# Altium PCB RemoteSensorUnit-v1.0.PcbDoc (part 5 of 5)
Units mm, origin at the board's own origin, x right, y up, seen from the top; angles counter-clockwise.
Board outline 80 x 114 mm, 2 copper layers (Top Layer, Bottom Layer), stack 1.448 mm thick; 163 components, 122 nets, 631 pads, 300 vias.
Unrouted connection lines stored in the file: 147.
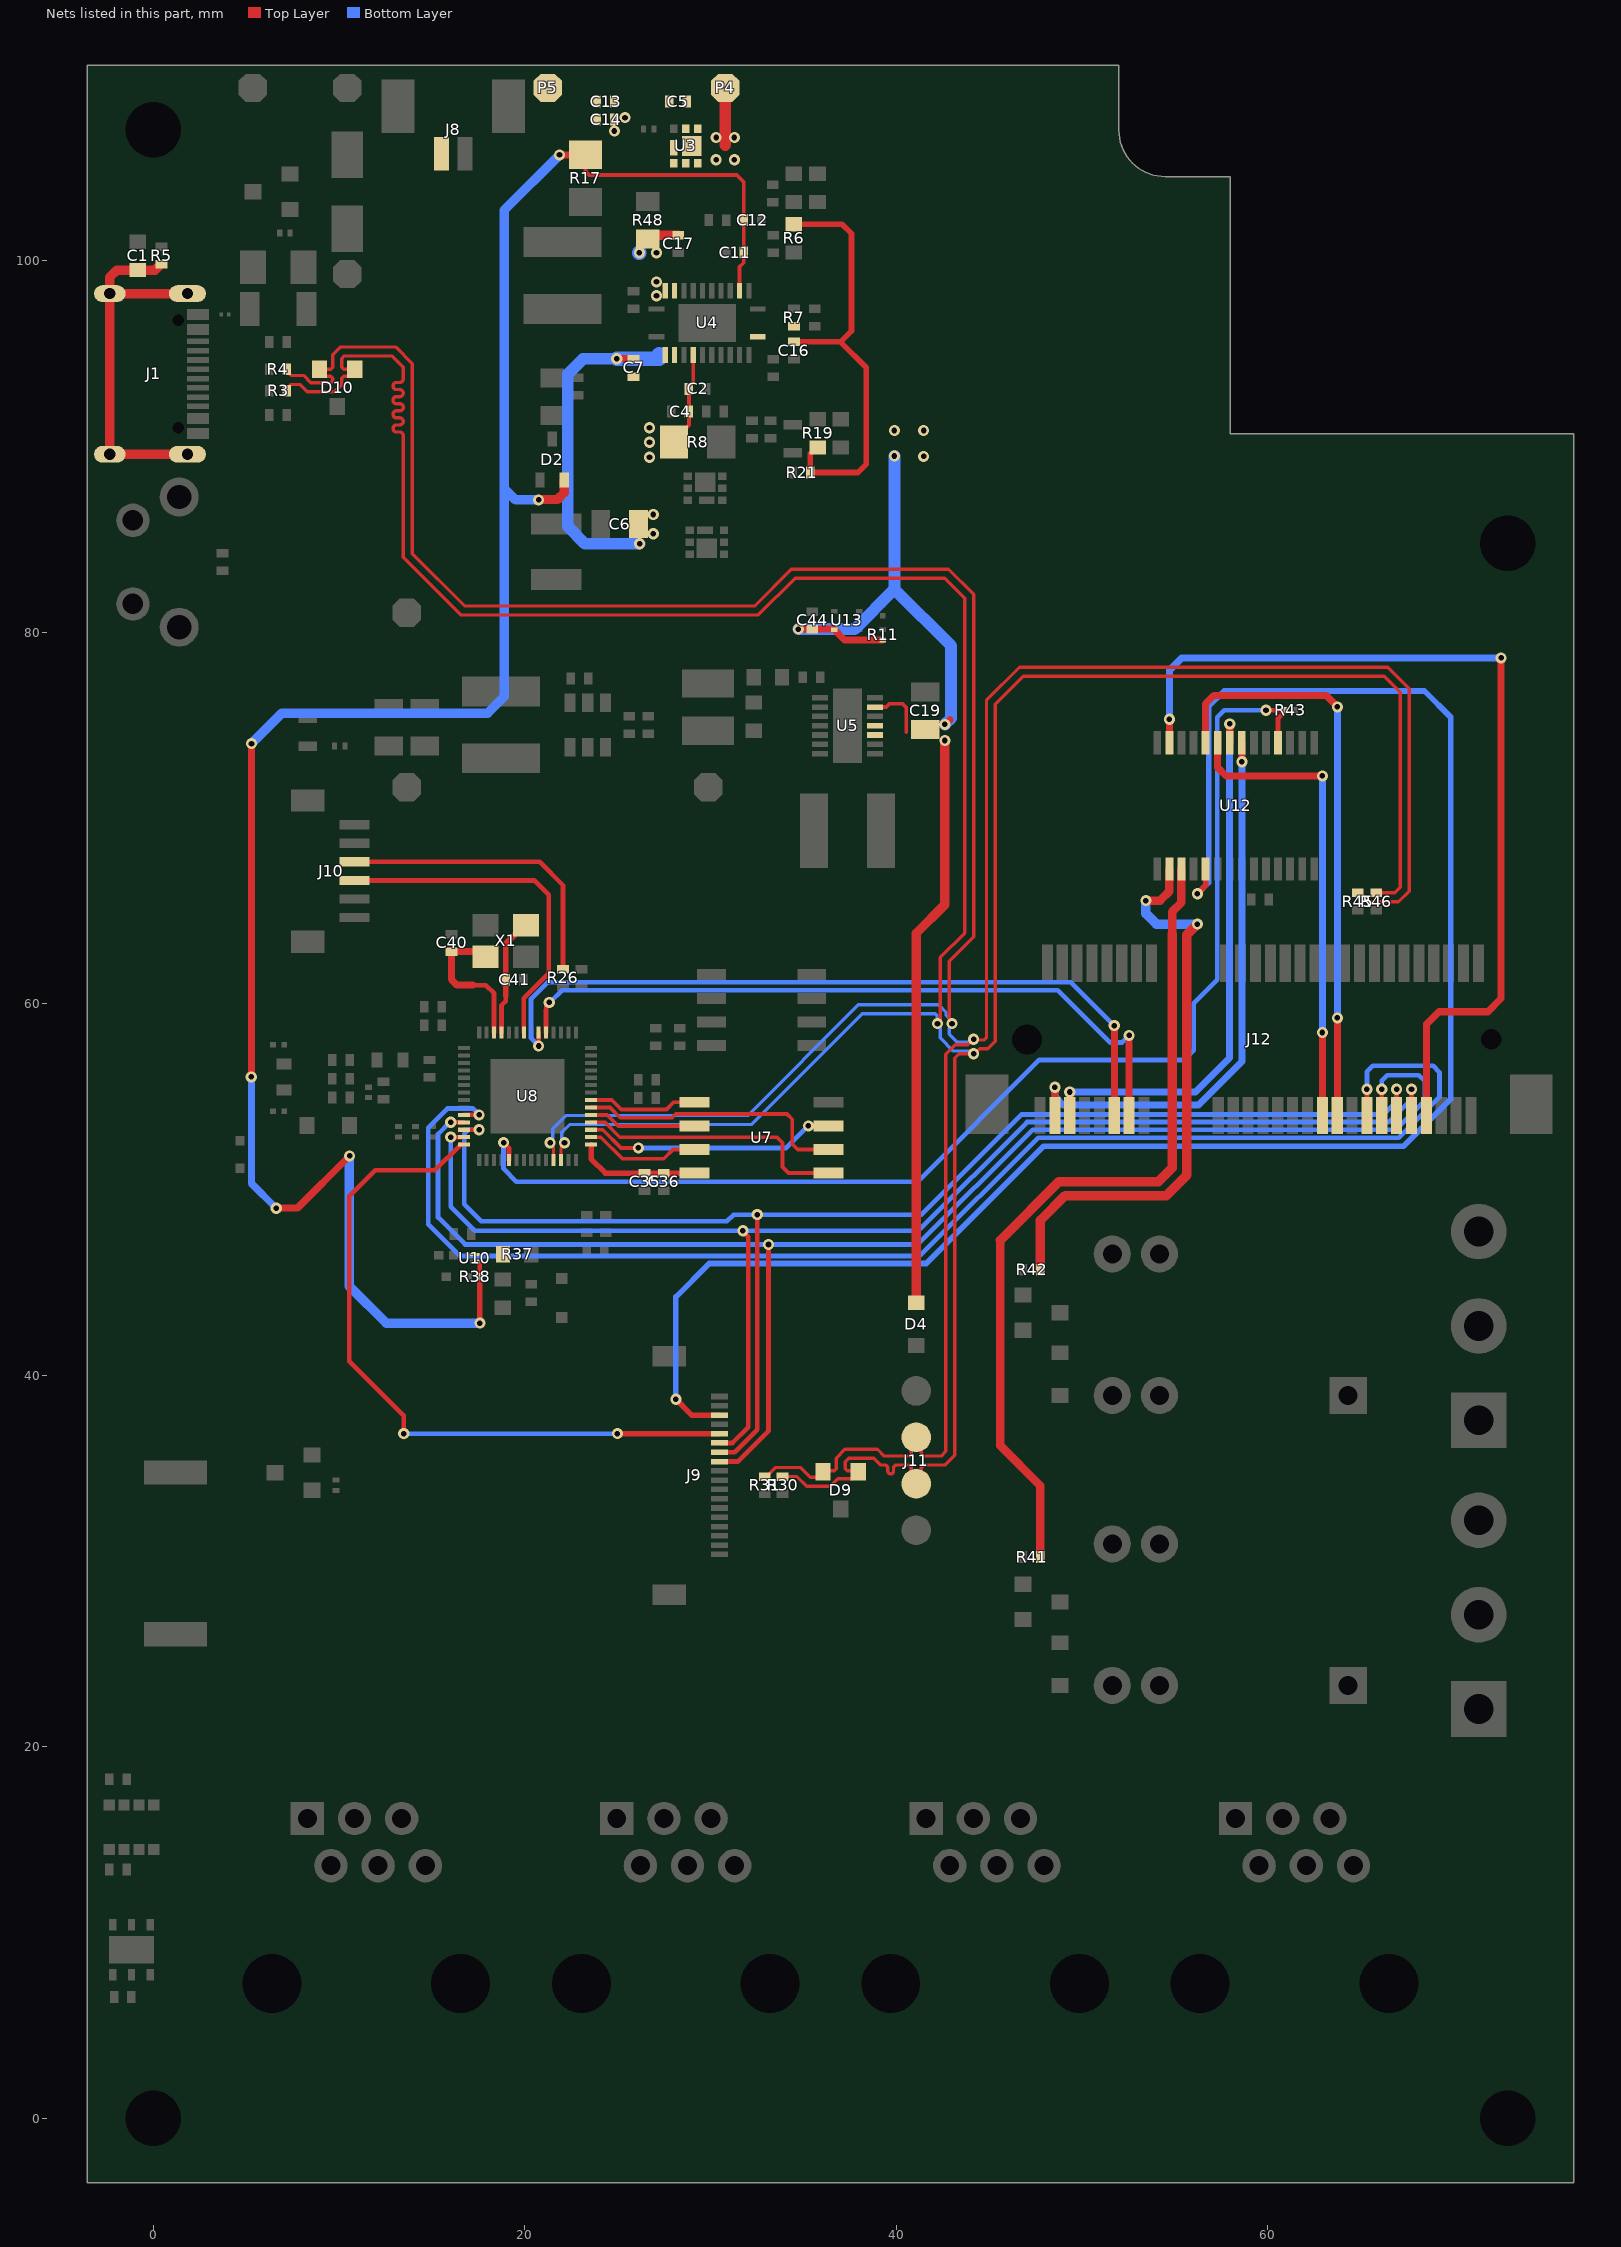
[diagram p3: the nets of this part, all layers, seen from the top]

## Via types
v1: diameter 0.6, hole 0.3, Top Layer to Bottom Layer, 300 vias

## Nets (pads, with @x,y where several pads share a name; then routed paths per layer and width w, separated by ;. In a path a pad name is that pad's centre, name@x,y a point inside that pad or via, vN(x,y) a via of type N, cw(c..) or ccw(c..) an arc to the next point about the centre after c; other vN are vias at no path point) (continued)
PGND: C5.2 C6.1 C7.1 C13.2 C14.2 C17.1 R48.2 U4.22 U4.23 | length 20.7
  Top Layer w0.381: v1(24.952,94.723) 25.834,94.723 cw(c25.834,94.7) C7.1@25.858,94.7
  Top Layer w0.508: R48.2@26.626,101.158 26.846,101.379 26.851,101.374 C17.1@28.27,101.374
  Bottom Layer w0.635: v1(24.952,94.723) 23.143,94.723 22.313,93.894 22.313,85.69 23.241,84.763 v1(26.187,84.763)
  Bottom Layer w0.762: v1(24.952,94.723) 27.242,94.723 ; v1@26.147,100.424 v1(26.175,100.424) ; 27.076,94.796 27.242,94.961
  other v1: 26.924,85.296 26.924,86.338 27.095,98.114 27.095,98.86 27.095,100.424 24.829,106.982 25.401,107.704
RELAY1: R41.1 U12.3 | length 45.1
  Top Layer w0.457: 45.606,47.26 45.606,36.199 47.763,34.041 R41.1@47.763,30.212 ; 54.855,63.754 54.855,64.95 55.357,65.452 U12.3@55.357,67.247
  Top Layer w0.508: 45.61,47.264 48.766,50.42 54.122,50.42 54.855,51.153 54.855,63.754
RELAY2: R42.1 U12.2 | length 31.7
  Top Layer w0.457: v1(53.441,65.552) 54.208,65.552 54.707,66.052 U12.2@54.707,67.247
  Top Layer w0.508: R42.1@47.763,45.682 47.763,48.338 49.091,49.666 54.547,49.666 55.652,50.77 55.652,63.717 v1(56.217,64.282)
  Bottom Layer w0.508: v1(53.441,65.552) 53.441,64.848 54.007,64.282 v1(56.217,64.282)
RST_M: R43.1 U8.19 U12.18 | length 67
  Top Layer w0.254: v1(18.862,52.525) 19.152,52.235 U8.19@19.152,51.59 ; v1(59.907,75.797) 60.924,75.797 60.932,75.789 60.932,75.747 60.557,75.372 U12.18@60.557,74.047
  Bottom Layer w0.254: v1(18.862,52.525) 18.862,51.118 19.558,50.422 41.148,50.422 47.697,56.971 55.501,56.971 56.014,57.485 56.014,60.029 57.285,61.3 57.285,75.419 57.664,75.797 v1(59.907,75.797)
RXD: J10.3 U8.50 | length 18.7
  Top Layer w0.254: J10.3@10.843,66.636 20.517,66.636 21.296,65.857 21.296,61.644 19.952,60.3 U8.50@19.952,58.44
Shell_: C1.2 J1.S1 J1.S2 J1.S3 J1.S4 R5.1 | length 21
  Top Layer w0.508: R5.1@0.441,99.8 0.403,99.8 0.098,99.495 C1.2@-0.838,99.495 -1.956,99.495 -2.337,99.114 J1.S3@-2.337,98.228 ; J1.S1@1.843,89.578 J1.S2@-2.337,89.578 J1.S3@-2.337,98.228 ; J1.S4@1.843,98.228 J1.S3@-2.337,98.228
SLOT_CS: J12.37 U8.10 | length 75.9
  Top Layer w0.254: U8.10@16.727,54.015 v1(17.549,54.015) ; J12.37@65.341,53.978 v1(65.341,55.392)
  Bottom Layer w0.254: v1(17.549,54.015) 17.202,54.362 15.847,54.362 14.811,53.325 14.811,48.119 16.511,46.418 41.27,46.418 47.641,52.789 67.061,52.789 69.247,54.975 69.247,56.311 68.901,56.657 65.663,56.657 65.341,56.336 v1(65.341,55.392)
SLOT_MISO: J9.7 J12.41 U8.12 | length 74.9
  Top Layer w0.254: U8.12@16.727,53.215 v1(17.549,53.215) ; J9.7@30.488,35.852 31.314,35.852 32.521,37.06 v1(32.521,48.644) ; J12.41@66.941,53.978 v1(66.941,55.392)
  Bottom Layer w0.254: v1(17.549,53.215) 16.96,53.215 16.739,52.993 16.739,49.2 17.65,48.289 30.887,48.289 31.242,48.644 v1(32.521,48.644) 41.359,48.644 46.744,54.029 66.224,54.029 66.941,54.746 v1(66.941,55.392)
SLOT_MOSI: J9.6 J12.43 U8.13 | length 74.2
  Top Layer w0.254: v1(16.022,52.815) U8.13@16.727,52.815 ; J9.6@30.488,36.352 31.187,36.352 32.042,37.207 32.042,47.458 31.75,47.75 v1(31.75,47.78) ; J12.43@67.741,53.978 v1(67.741,55.392)
  Bottom Layer w0.254: v1(16.022,52.815) 16.022,49.07 17.312,47.78 v1(31.75,47.78) 41.196,47.78 47.042,53.626 66.521,53.626 67.741,54.847 v1(67.741,55.392)
SLOT_SCLK: J9.8 J12.39 U8.11 | length 82.1
  Top Layer w0.254: v1@15.928,53.615 v1(16.022,53.615) U8.11@16.727,53.615 ; J9.8@30.488,35.352 31.472,35.352 33.126,37.006 v1(33.126,47.038) v1@33.192,47.105 ; J12.39@66.141,53.978 v1(66.141,55.392)
  Bottom Layer w0.254: v1(16.022,53.615) 15.967,53.615 15.337,52.985 15.337,48.492 16.791,47.038 v1(33.126,47.038) 41.172,47.038 47.347,53.213 66.883,53.213 68.472,54.801 68.472,55.82 68.137,56.154 66.433,56.154 66.141,55.862 v1(66.141,55.392)
SLOT_TYPE0: J12.3 U12.21 | length 30.4
  Top Layer w0.381: J12.3@48.541,53.978 v1(48.541,55.502) ; v1(58.607,73.028) U12.21@58.607,74.047
  Bottom Layer w0.381: v1(48.541,55.502) 48.541,54.998 48.984,54.555 56.274,54.555 58.607,56.888 v1(58.607,73.028)
SLOT_TYPE1: J12.5 U12.22 | length 29.6
  Top Layer w0.381: J12.5@49.341,53.978 v1(49.341,55.248) ; U12.22@57.957,74.047 v1(57.957,75.06)
  Bottom Layer w0.381: v1(49.341,55.248) 56.112,55.248 57.939,57.075 57.939,75.042 v1(57.957,75.06)
SLOT_TYPE2: J12.31 U12.23 | length 25.4
  Top Layer w0.381: U12.23@57.307,74.047 57.307,72.706 57.747,72.266 v1(62.941,72.266) ; J12.31@62.941,53.978 v1(62.941,58.45)
  Bottom Layer w0.381: v1(62.941,58.45) v1(62.941,72.266)
SLOT_TYPE3: J12.33 U12.24 | length 31.6
  Top Layer w0.381: U12.24@56.657,74.047 56.657,76.144 57.097,76.584 63.152,76.584 v1(63.754,75.982) ; J12.33@63.741,53.978 63.748,53.985 63.748,59.229 v1(63.754,59.236)
  Bottom Layer w0.381: v1(63.754,59.236) v1(63.754,75.982)
SLOT_UART_RX: J12.11 U8.48 | length 41
  Top Layer w0.254: v1(20.752,57.725) U8.48@20.752,58.44
  Top Layer w0.381: J12.11@51.741,53.978 v1(51.741,58.824)
  Bottom Layer w0.254: v1(20.752,57.725) 20.343,58.134 20.343,60.271 21.231,61.16 49.406,61.16 v1(51.741,58.824)
SLOT_UART_TX: J12.13 U8.47 | length 38.8
  Top Layer w0.254: U8.47@21.152,58.44 21.15,58.887 21.15,59.665 cw(c21.727,59.665) v1(21.319,60.073)
  Top Layer w0.381: J12.13@52.541,53.978 v1(52.541,58.296)
  Bottom Layer w0.254: v1(21.319,60.073) 21.363,60.073 22.02,60.731 48.699,60.731 51.521,57.909 52.154,57.909 v1(52.541,58.296)
SPICLK: U7.6 U8.33 | length 5.8
  Top Layer w0.203: U8.33@23.577,54.015 24.446,54.015 25.041,53.42 U7.6@29.15,53.42
SPICS0: U7.1 U8.32 | length 14.7
  Top Layer w0.203: U8.32@23.577,53.615 24.317,53.615 25.117,52.815 33.581,52.815 33.88,52.516 33.88,51.206 34.206,50.88 U7.1@36.36,50.88
SPID: U7.5 U8.35 | length 5.9
  Top Layer w0.203: U8.35@23.577,54.815 24.691,54.815 25.201,54.305 27.631,54.305 28.016,54.69 U7.5@29.15,54.69
SPIHD: U7.7 U8.30 | length 6.3
  Top Layer w0.203: U8.30@23.577,52.815 24.098,52.815 25.259,51.653 27.49,51.653 27.986,52.15 U7.7@29.15,52.15
SPIQ: U7.2 U8.34 | length 14.7
  Top Layer w0.203: U8.34@23.577,54.415 24.586,54.415 25.145,53.856 27.931,53.856 28.132,54.058 34.126,54.058 34.405,53.779 34.405,52.44 34.695,52.15 U7.2@36.36,52.15
SPIWP: U7.3 U8.31 | length 13.7
  Top Layer w0.203: U8.31@23.577,53.215 24.201,53.215 25.18,52.235 v1(26.121,52.235)
  Top Layer w0.254: v1(35.27,53.42) U7.3@36.36,53.42
  Bottom Layer w0.254: v1(26.121,52.235) 34.086,52.235 v1(35.27,53.42)
TFT_CS: J9.5 U8.14 | length 38.5
  Top Layer w0.254: v1@13.487,36.678 13.487,37.83 10.559,40.758 10.559,49.644 11.952,51.037 15.168,51.037 16.546,52.415 U8.14@16.727,52.415
  Top Layer w0.305: v1(24.994,36.852) J9.5@30.488,36.852
  Bottom Layer w0.254: v1(13.487,36.852) 24.965,36.852 v1@24.994,36.881
TFT_RESET: J9.3 U12.5 | length 100.7
  Top Layer w0.305: v1(28.137,38.702) 28.987,37.852 J9.3@30.488,37.852 ; v1(56.217,65.916) 56.657,66.356 U12.5@56.657,67.247
  Bottom Layer w0.305: v1(28.137,38.702) 28.137,44.215 29.934,46.012 41.621,46.012 47.933,52.324 67.311,52.324 69.85,54.863 69.85,75.42 68.432,76.838 57.658,76.838 56.82,76 56.82,66.519 v1(56.217,65.916)
TXD: J10.4 R26.2 | length 16.3
  Top Layer w0.254: J10.4@10.843,67.636 20.799,67.636 22.062,66.373 R26.2@22.062,61.865
USB.USB_N: D9.2 D10.2 J11.2 R4.2 R31.2 R45.2 U8.25 | length 198.9
  Top Layer w0.178: R4.2@7.188,94.153 7.328,94.014 7.328,93.924 7.432,93.82 8.095,93.82 8.488,93.427 9.561,93.427 9.665,93.531 9.665,93.678 9.561,93.782 9.277,93.782 8.956,94.103 D10.2@8.956,94.153 9.561,94.153 9.665,94.257 9.665,94.93 10.09,95.355 13.047,95.355 13.945,94.457 13.945,84.229 16.764,81.41 32.377,81.41 34.356,83.389 42.816,83.389 44.171,82.034 44.171,63.605 42.855,62.289 v1@42.855,58.931 ; v1(21.367,52.513) 21.367,52.399 21.552,52.214 U8.25@21.552,51.59 ; R31.2@32.923,34.546 33.012,34.546 33.494,35.028 34.86,35.028 35.385,34.502 35.762,34.502 D9.2@36.062,34.802 ; D9.2@36.112,34.852 36.667,34.852 36.771,34.957 36.771,35.541 37.242,36.012 38.993,36.012 39.358,35.647 40.7,35.647 40.804,35.751 40.804,36.006 41.076,36.279 41.076,36.425 J11.2@41.348,36.153 ; J11.2@41.076,36.656 41.348,36.384 J11.2@41.348,36.153 ; R45.2@64.842,65.967 64.991,65.967 65.473,65.485 67.041,65.485 67.615,66.058 67.615,76.962 66.469,78.108 46.638,78.108 44.856,76.327 44.856,58.169 44.737,58.05 44.204,58.05 v1(44.171,58.083) 44.147,58.083 43.852,57.788 43.183,57.788 42.672,57.277 42.672,35.901 42.418,35.647 41.489,35.647 41.348,35.788 J11.2@41.348,36.153
  Bottom Layer w0.178: v1(21.367,52.513) 21.367,52.628 21.514,52.775 21.514,53.28 22.213,53.978 32.002,53.978 37.961,59.938 42.294,59.938 42.681,59.551 42.681,59.366 43.002,59.045 v1(43.002,58.931) 43.002,58.817 42.855,58.669 42.855,58.364 43.283,57.936 43.909,57.936 44.056,58.083 v1(44.171,58.083)
USB.USB_P: D9.1 D10.1 J11.3 R3.2 R30.2 R46.2 U8.26 | length 198.4
  Top Layer w0.178: R3.2@7.194,93.003 7.334,93.143 7.334,93.233 7.438,93.337 7.895,93.337 8.288,92.944 9.76,92.944 10.147,93.331 10.147,93.678 10.251,93.782 10.535,93.782 10.856,94.103 D10.1@10.856,94.153 10.251,94.153 10.147,94.257 10.147,94.73 10.29,94.872 12.847,94.872 13.462,94.257 13.462,94.103 13.462,93.633 cw(c13.272,93.633) 13.272,93.443 13.101,93.443 ccw(c13.101,93.252) 13.101,93.062 13.272,93.062 cw(c13.272,92.871) 13.272,92.681 13.101,92.681 ccw(c13.101,92.49) 13.101,92.3 13.272,92.3 cw(c13.272,92.109) 13.272,91.919 13.101,91.919 ccw(c13.101,91.728) 13.101,91.538 13.272,91.538 cw(c13.272,91.347) 13.272,91.157 13.101,91.157 ccw(c13.101,90.966) 13.101,90.776 13.272,90.776 cw(c13.272,90.585) 13.462,90.585 13.462,89.572 13.462,84.03 16.564,80.927 32.577,80.927 34.556,82.907 42.616,82.907 43.688,81.834 43.688,63.804 42.372,62.489 v1@42.372,58.931 ; U8.26@21.952,51.59 21.952,52.206 22.144,52.399 v1(22.144,52.513) ; R30.2@33.884,34.546 34.66,34.546 35.185,34.02 36.455,34.02 36.866,34.431 37.641,34.431 37.962,34.752 D9.1@37.962,34.802 37.912,34.852 37.357,34.852 37.253,34.957 37.253,35.341 37.442,35.529 38.367,35.529 38.793,35.529 39.158,35.164 39.37,35.164 cw(c39.37,34.987) 39.548,34.987 39.548,34.841 ccw(c39.701,34.841) 39.853,34.841 39.853,34.987 cw(c40.031,34.987) 40.031,35.164 40.558,35.164 40.683,35.164 40.804,35.043 40.804,34.614 41.076,34.342 J11.3@41.348,34.614 ; J11.3@41.076,34.156 41.348,34.428 J11.3@41.348,34.614 ; R46.2@65.842,65.967 66.841,65.967 67.132,66.258 67.132,76.762 66.269,77.625 46.838,77.625 45.339,76.127 45.339,57.969 44.937,57.567 44.486,57.567 44.224,57.305 v1(44.171,57.305) 43.383,57.305 43.155,57.077 43.155,35.701 42.618,35.164 41.489,35.164 41.348,35.023 J11.3@41.348,34.614
  Bottom Layer w0.178: v1(22.144,52.513) 22.144,52.627 21.997,52.775 21.997,53.08 22.413,53.495 32.202,53.495 38.161,59.455 42.094,59.455 42.198,59.351 42.198,58.957 v1(42.224,58.931) 42.224,58.817 42.372,58.669 42.372,58.164 43.083,57.453 43.909,57.453 44.056,57.305 v1(44.171,57.305)
V_MON: R37.1 U10.3
VBAT: C11.1 C12.1 C13.1 C14.1 D2.2 J8.2 P5.1 R17.2 R38.1 U3.4 U3.8 U4.15 U10.2 | length 115.2
  Top Layer w0.203: R17.2@23.273,105.697 23.273,104.806 23.469,104.611 31.421,104.611 31.788,104.244 C12.1@31.788,102.187 C11.1@31.788,100.435 31.788,99.886 31.57,99.668 U4.15@31.57,98.378
  Top Layer w0.254: U10.2@17.506,46.104 17.585,46.026 R38.1@17.585,45.31
  Top Layer w0.305: v1(17.585,42.806) R38.1@17.585,45.277
  Top Layer w0.381: v1(5.283,56.058) v1@5.283,73.993 ; v1(6.622,48.992) 7.758,48.992 v1@10.57,51.804 ; v1(21.874,105.697) R17.2@23.273,105.697
  Top Layer w0.508: v1@10.57,51.804 v1(10.573,51.804) ; v1(20.752,87.125) 20.769,87.143 21.76,87.143 22.126,87.509 D2.2@22.126,88.194
  Bottom Layer w0.381: v1(5.283,56.058) 5.283,50.331 v1@6.605,49.009
  Bottom Layer w0.508: v1(5.294,74.004) 6.934,75.644 18.009,75.644 18.902,76.538 18.902,87.736 ; v1@6.605,49.009 v1(6.622,48.992) ; v1(10.573,51.804) 10.566,51.797 10.566,44.783 12.544,42.806 v1(17.585,42.806) ; v1(20.752,87.125) 19.513,87.125 18.902,87.736 ; v1(21.874,105.697) 18.902,102.725 18.902,87.736
VBUS: C2.1 C4.1 C5.1 C7.2 C19.2 C44.1 D4.1 P4.1 R8.2 R11.2 U3.1 U3.2 U3.5 U3.6 U3.7 U4.2 U4.3 U4.5 U5.10 U5.11 U5.13 U13.5 | length 69.4
  Top Layer w0.203: R8.2@28.042,90.229 28.042,90.356 28.842,91.156 C4.1@28.842,91.88 C2.1@28.842,93.094 28.842,93.183 29.07,93.411 U4.5@29.07,94.928 ; U5.13@38.854,75.967 39.464,75.967 39.642,76.145 40.342,76.145 40.545,75.942 40.545,74.617
  Top Layer w0.381: v1(34.735,80.167) C44.1@35.479,80.167 36.636,80.167 U13.5@36.666,80.136 37.216,79.586 R11.2@39.279,79.586 ; v1(42.621,75.035) 42.653,75.035 42.895,75.276 42.895,75.308
  Top Layer w0.508: D4.1@41.076,43.902 41.076,63.793 42.621,65.338 v1(42.621,74.171)
  Top Layer w0.635: 30.798,106.226 P4.1@30.798,109.3
  Bottom Layer w0.635: v1(34.735,80.167) 37.76,80.167 39.904,82.311 ; v1(39.904,89.487) 39.904,82.311 ; v1(42.621,75.035) 42.951,75.365 42.951,79.264 39.904,82.311
  other v1: 26.721,89.417 41.478,89.462 26.721,90.229 39.904,90.859 41.478,90.859 26.721,91.003 30.302,105.43 31.293,105.43 30.302,106.632 31.293,106.632
VDD_SPI: C35.2 C36.2 U7.8 U8.29 | length 6.7
  Top Layer w0.305: U8.29@23.577,52.415 23.577,51.648 24.345,50.88 C35.2@26.45,50.88 C36.2@27.491,50.88 U7.8@29.15,50.88
VREF: C16.2 R6.2 R7.2 R19.2 R21.1 U4.12 | length 23.8
  Top Layer w0.305: C16.2@34.496,95.628 37.007,95.628 ; R6.2@34.496,101.963 37.083,101.963 37.592,101.454 37.592,96.214 37.007,95.628 ; R19.2@35.775,89.94 35.712,89.94 35.373,89.601 R21.1@35.373,88.596 37.936,88.596 38.395,89.055 38.395,94.24 37.007,95.628
W5500_INT: J12.45 U12.27 | length 49.9
  Top Layer w0.381: U12.27@54.707,74.047 v1(54.707,75.314) ; J12.45@68.541,53.978 68.541,58.892 69.215,59.566 71.857,59.566 72.568,60.277 v1(72.568,78.616)
  Bottom Layer w0.381: v1(54.707,75.314) 54.707,77.951 55.372,78.616 v1(72.568,78.616)
XTAL_IN: C40.2 U8.54 X1.1 | length 8.2
  Top Layer w0.254: 17.227,60.997 17.909,60.997 18.352,60.554 U8.54@18.352,58.44
  Top Layer w0.381: C40.2@15.974,62.799 17.611,62.799 X1.1@17.88,62.53 ; C40.2@16.063,62.799 16.063,61.293 16.36,60.997 17.227,60.997
XTAL_OUT: C41.2 U8.53 X1.3 | length 6.4
  Top Layer w0.254: U8.53@18.752,58.44 18.752,59.912 18.98,60.141 18.98,60.412
  Top Layer w0.305: 18.98,60.412 18.98,61.078 18.98,63.23 19.98,64.23 X1.3@20.08,64.23
pads on no net: J1.A8 J1.B8 J1.MH J3.1 J3.5 J3.6 J3.MH J4.1 J4.5 J4.6 J4.MH J6.1 J6.5 J6.6 J6.MH J7.1 J7.5 J7.6 J7.MH J8.MP1 J8.MP2 J9.1 J12.12 J12.14 J12.16 J12.20 J12.22 J12.MH U5.14 U8.8 U8.28 U8.38 U8.39 U8.40 U8.41 U8.42 U8.51 U8.52 U9.1 U9.2 U9.3 U9.7 U11.3 U11.4 U11.7 U12.6 U12.7 U12.8 U12.11 U12.14 U12.19 U12.20 U12.28 U13.3

## Polygon pours and split planes (outlines as drawn)
GND on Top Layer "GND_L01_P019" (solid, pour order 19): 51.435,106.48 ccw(c53.975,106.48) 53.975,103.94 57.455,103.94 57.455,89.741 75.819,89.741 75.819,50.879 75.362,50.422 66.561,50.422 ccw(c66.561,49.746) 65.885,49.746 cw(c65.466,49.745) 65.466,49.327 50.949,49.327 ccw(c50.949,47.552) 49.174,47.552 49.174,18.113 75.819,18.113 75.819,-2.74 -2.794,-2.74 -2.794,109.909 51.435,109.909
CMSRC on Top Layer "CMSRC_L01_P002" (solid, pour order 2): 31.785,85.982 31.985,85.782 31.985,84.344 32.139,84.189 35.781,84.189 35.966,84.374 35.966,88.058 33.696,88.058 33.696,88.852 33.507,89.041 32.781,89.041 32.55,89.271 32.55,90.675 31.886,90.675 31.657,90.447 31.657,87.521 31.432,87.296 29.381,87.296 29.381,86.744 29.127,86.49 28.324,86.49 28.07,86.236 28.07,85.532 28.313,85.289 30.135,85.289 30.135,85.689 30.428,85.982
VBUS on Top Layer "VBUS_L01_P011" (solid, pour order 11): 39.091,101.679 39.091,84.798 39.685,84.204 41.656,84.204 42.215,84.763 42.215,105.184 40.818,106.581 35.992,106.581 35.992,108.881 28.477,108.881 28.477,105.025 33.151,105.025 33.438,105.311 35.914,105.311 37.306,105.311 39.091,103.526
5V on Top Layer "5V_L01_P001" (solid, pour order 1): 14.503,106.607 14.503,99.088 14.986,98.606 17.221,98.606 18.263,97.564 18.263,89.127 18.796,88.594 19.715,88.594 19.888,88.594 21.076,88.594 21.076,87.794 20.125,87.794 19.888,87.557 19.888,86.729 19.888,84.864 20.564,84.189 26.877,84.189 27.806,84.189 27.806,85.039 30.956,85.039 30.956,82.129 19.271,82.129 16.408,84.991 16.408,96.677 16.029,97.056 13.808,97.056 13.047,97.817 13.047,103.415 12.827,103.635 10.109,103.635 10.109,106.962 14.149,106.962
VBUS on Top Layer "VBUS_L01_P009" (solid, pour order 9): 25.54,91.265 25.54,89.478 25.978,89.041 28.804,89.041 28.804,91.118 27.28,91.118 27.28,93.989 27.593,94.302 28.009,94.302 28.21,94.503 28.21,95.353 26.719,95.353 26.582,95.216 26.582,94.23 26.34,93.988 25.54,93.988
NetC2_2 on Top Layer "NETC2_2_L01_P008" (solid, pour order 8): 25.227,90.843 25.227,89.157 25.624,88.76 29.539,88.76 29.82,89.041 29.82,91.118 31.344,91.118 31.344,87.717 31.173,87.546 27.673,87.546 27.223,87.096 23.448,87.096 23.038,87.506 23.038,90.889 23.267,91.117 24.952,91.117
NetC9_2 on Top Layer "NETC9_2_L01_P006" (solid, pour order 6): 19.948,98.606 19.948,95.151 24.279,95.151 24.89,95.763 27.52,95.763 27.52,97.543 26.67,97.543 26.582,97.632 25.238,97.632 24.264,98.606
NetD1_1 on Top Layer "NETD1_1_L01_P000" (solid, pour order 0): 3.771,96.603 3.961,96.793 3.961,98.112 4.161,98.312 5.726,98.312 5.726,96.365 5.364,96.003 1.813,96.003 1.463,95.653 0.791,95.653 0.413,95.275 0.413,92.603 1.213,91.803 3.013,91.803 3.013,91.203 1.813,91.203 1.513,91.503 -0.789,91.503 -1.283,91.997 -1.283,95.859 -0.838,96.303 1.513,96.303 1.813,96.603
GND on Bottom Layer "GND_L02_P015" (solid, pour order 15): 51.435,106.48 ccw(c53.975,106.48) 53.975,103.94 57.455,103.94 57.455,89.741 75.819,89.741 75.819,50.879 75.362,50.422 66.561,50.422 ccw(c66.561,49.746) 65.885,49.746 cw(c65.466,49.745) 65.466,49.327 50.949,49.327 ccw(c50.949,47.552) 49.174,47.552 49.174,18.113 75.819,18.113 75.819,-2.74 -2.794,-2.74 -2.794,109.909 51.435,109.909
CMSRC on Bottom Layer "CMSRC_L02_P018" (solid, pour order 18): 31.648,87.028 33.755,87.028 33.957,87.229 33.957,88.367 34.453,88.864 36.222,88.864 36.549,88.537 36.549,85.348 36.135,84.935 32.272,84.935 32.008,85.199 32.008,86.164 31.822,86.164 31.648,86.338
GATE_DRIVER on Bottom Layer "GATE_DRIVER_L02_P010" (solid, pour order 10): 27.508,88.497 27.824,88.812 32.393,88.812 32.712,89.132 32.712,89.622 32.866,89.777 33.569,89.777 33.698,89.648 33.698,87.426 33.558,87.287 30.629,87.287 30.48,87.154 30.48,86.137 30.635,85.982 31.648,85.982 31.801,85.83 31.801,85.068 31.648,84.915 27.737,84.915 27.508,85.144
VBUS on Bottom Layer "VBUS_L02_P013" (solid, pour order 13): 32.393,89.777 32.687,90.071 33.698,90.071 33.985,89.784 33.985,89.132 35.966,89.132 36.57,89.735 37.27,89.735 37.987,89.017 42.215,89.017 42.215,91.57 36.754,91.57 36.444,91.88 31.915,91.88 31.503,91.468 30.861,91.468 30.389,91.94 26.01,91.94 26.01,89.017 32.138,89.017 32.393,89.271
NetC9_2 on Bottom Layer "NETC9_2_L02_P007" (solid, pour order 7): 19.837,95.659 20.193,95.304 24.434,95.304 24.841,95.714 24.841,98.428 24.409,98.86 20.218,98.86 19.837,98.479

## Keep-outs
Keep-Out Layer:
  circle w0.127: c0,107.047 r1.947
  circle w0.127: c72.924,84.793 r1.947
  circle w0.127: c72.924,0 r1.947
  circle w0.127: c0,0 r1.947
  pour cut-out: 76.462,50.32 66.853,50.32 ccw(c66.853,49.228) 65.761,49.228 cw(c65.583,49.228) 65.583,49.05 50.8,49.05 ccw(c50.8,47.73) 49.479,47.73 49.479,19.79 ccw(c51.04,19.676) 50.926,18.115 76.225,18.115 76.462,50.034

## Other copper
Top Layer:
  rectangle net GND: 5.91,53.922 6.602,54.362
  rectangle net 3V9: 30.028,29.489 30.948,30.502
  rectangle net VBAT: 18.243,104.935 22.836,106.048
  region net VBAT: 18.243,106.048 18.243,103.455 19.304,103.455 19.304,106.048
  rectangle net VBAT: 15.011,103.356 19.304,104.342
  rectangle net VBAT: 15.011,103.356 16.016,106.664
  rectangle net 5V_POE: 6.904,102.352 12.657,103.172
  rectangle net 5V_POE: 9.561,98.312 12.649,103.172
  rectangle net 3V3: 12.888,70.886 14.412,74.375
  rectangle net GND: 25.991,102.492 28.092,103.864
  rectangle net PGND: 26.719,97.869 28.21,98.885
  rectangle net PGND: 24.519,107.28 25.476,107.915
  rectangle net PGND: 24.519,107.547 25.735,109.09
  rectangle net PGND: 24.519,106.685 25.127,109.09
  rectangle net PGND: 24.6,108.246 28.003,109.09
  rectangle net PGND: 26.719,97.869 27.71,99.161
  rectangle net PGND: 25.858,100.102 27.43,101.666
  rectangle net PGND: 25.622,84.458 27.242,86.642
  rectangle net NetC6_2: 20.332,85.059 24.606,86.583
  rectangle net 3V3: -0.502,25.405 2.898,27.92
  rectangle net VBUS: 40.799,73.817 43.085,75.467
  rectangle net 3V3: 9.423,52.464 10.265,53.889
  rectangle net 3V3: 9.423,52.989 10.973,53.889
  rectangle net VBUS: 39.383,87.328 42.037,92.246
  rectangle net VBUS: 25.978,89.041 27.28,91.522
  rectangle net VBUS: 26.292,89.041 28.804,91.118
  rectangle net NetC10_1: 19.66,100.203 25.425,103.919
  rectangle net VBUS: 28.477,105.025 32.195,107.325
  rectangle net 5V_POE: 36.298,106.866 38.545,108.842
  rectangle net VBAT: 22.384,104.935 28.227,106.504
  rectangle net VBAT: 20.472,104.935 24.162,110.062
  rectangle net ISET: 34.179,96.933 35.931,97.632
  rectangle net ISET: 32.12,96.933 34.814,97.632
  rectangle net VREF: 32.12,95.763 34.814,96.23
  rectangle net VREF: 34.179,95.4 34.814,96.692
  rectangle net 5V_POE: 68.641,61.178 70.041,63.178
  rectangle net BAT_ADC: 18.383,44.677 22.296,45.54
  rectangle net BAT_ADC: 19.971,44.677 20.733,46.947
  rectangle net V_MON: 18.36,46.058 19.209,46.947
  rectangle net V_MON: 17.06,46.426 19.209,46.947
  rectangle net NetQ5_1: 8.093,33.395 10.024,33.94
  rectangle net NetC32_2: 13.141,56.569 13.955,57.369
  rectangle net NetC32_2: 13.141,56.705 17.052,57.255
  rectangle net 3V3: 17.442,58.115 18.062,58.765
  rectangle net EN: 11.404,54.212 12.341,55.087
  rectangle net EN: 11.404,54.635 12.721,55.087
  rectangle net 5V_USB: 4.664,98.738 6.064,104.122
  rectangle net NetF1_2: 7.384,96.492 8.782,100.558
  rectangle net 5V: 6.904,103.635 11.7,106.962
  rectangle net 5V_POE: 7.229,101.297 12.657,103.172
  rectangle net 5V_POE: 10,100.462 11.7,103.172
  rectangle net 3V9: 23.098,73.31 34.239,74.768
  rectangle net 3V9: 28.48,73.934 34.239,75.117
  rectangle net 3V9: 28.48,73.934 31.274,75.458
  rectangle net 3V9: 31.89,74.317 36.329,75.117
  rectangle net NetL2_2: 34.829,67.307 36.329,74.117
  rectangle net VBUS: 38.429,74.317 39.279,75.117
  rectangle net NetC20_1: 35.479,76.317 36.329,76.617
  rectangle net NetC20_1: 35.675,76.317 36.329,77.998
  region net NetL2_1: 39.929,74.117 38.429,74.117 38.429,67.307 39.929,67.307
  rectangle net VBUS: 38.429,74.317 42.323,74.983
  rectangle net VBUS: 40.799,74.248 42.323,75.264
  rectangle net 3V3: 11.915,73.359 15.374,74.375
  rectangle net 3V3: 11.915,72.41 22.748,74.31
  rectangle net NetC21_1: 16.624,76.01 20.824,77.61
  rectangle net NO_2: 67.723,45.027 73.311,49.132
  rectangle net NO_1: 52.991,29.484 73.311,32.116
  rectangle net IN_1: 63.333,22.299 65.691,28.609
  rectangle net IN_1: 63.333,25.609 73.311,28.609
  rectangle net NO_1: 67.723,29.484 73.311,33.589
  rectangle net IN_2: 63.333,41.152 73.311,44.152
  rectangle net IN_2: 63.333,37.842 65.691,44.152
  rectangle net NO_2: 52.991,45.027 73.311,47.659
  rectangle net GND: 60.641,61.178 62.041,63.178
  rectangle net GND: 66.241,61.178 68.441,63.178
  pour cut-out: -3.42,35.815 -3.42,77.955 4.99,77.955 4.99,35.815
Bottom Layer:
  rectangle net 5V_POE: 11.176,100.054 13.081,103.305
  rectangle net CMSRC: 32.05,85.562 34.453,86.807
  rectangle net CMSRC: 31.648,86.284 34.453,87.028
  rectangle net PGND: 25.731,84.445 27.228,86.642
  rectangle net PGND: 24.435,99.901 25.229,107.978
  rectangle net PGND: 24.435,107.445 25.603,107.978
  rectangle net PGND: 26.695,94.339 27.635,100.841
  rectangle net PGND: 24.435,99.901 27.635,100.841
  rectangle net VBUS: 41.935,73.79 43.282,75.822
  rectangle net VBUS: 39.383,89.017 42.037,91.408
  rectangle net GATE_DRIVER: 32.712,88.812 33.698,89.777
  rectangle net VBUS: 29.299,104.905 32.08,107.097
  rectangle net VBUS: 26.01,89.017 27.33,91.94
  rectangle net GATE_DRIVER: 30.046,84.915 31.801,85.982
  rectangle net 5V_POE: 35.331,106.866 38.545,108.842
  rectangle net NC_1: 66.453,20.529 72.863,23.529
  rectangle net NC_1: 66.453,20.529 68.89,28.722
  rectangle net NC_1: 50.577,26.64 68.89,28.722
  rectangle net NC_2: 66.453,36.072 68.89,44.265
  rectangle net NC_2: 66.453,36.072 72.863,39.072
  rectangle net NC_2: 50.577,42.183 52.633,47.651
  rectangle net NC_2: 50.577,42.183 68.89,44.265
  rectangle net NC_1: 50.577,26.64 52.633,32.108
  pour cut-out: -3.42,35.815 -3.42,77.955 4.99,77.955 4.99,35.815

## Silkscreen, mask and mechanical layers (free items; w line width, h text height)
Top Overlay:
  drawing of 175 lines, arcs and shapes, not listed
  text "VBUS" at 31.826,108.815 h1
  text "5V" at 7.297,108.758 h1
  text "VBAT" at 20.231,107.4 h1
  text "5V_USB" at 3.539,107.216 h1
  text "+" at 15.223,103.899 h0.89
  text "5" at 24.862,103.397 h0.76
  text "3" at 30.988,103.051 h0.76
  text "2" at 44.882,101.298 h0.76
  text "5" at 50.292,101.298 h0.76
  text "5V_PoE" at 11.485,98.745 h1
  text "1" at 43.25,95.1 h0.76
  text "3" at 53.061,93.323 h0.76
  text "2" at 24.439,93.247 h0.76
  text "1" at 26.866,91.927 h0.76
  text "GND" at 10.135,80.635 h1
  text "3V3" at 12.478,69.797 h1
  text "3V9" at 28.651,69.789 h1
  text "4" at 9.518,61.187 h0.76
  text "4" at 15.236,54.634 h0.76
Dimensions:
  circle w0.254: c72.924,0 r3
  circle w0.254: c0,0 r3
  circle w0.254: c0,107.047 r3
  circle w0.254: c72.924,84.793 r3
Board Outline:
  lines w0.178: 57.988,104.524 ccw(c57.988,104.524) 57.988,104.524
  lines w0.254: -3.538,-3.476 76.462,-3.476 76.462,90.693 57.988,90.693 57.988,104.524 54.488,104.524 cw(c54.488,107.024) 51.988,107.024 51.988,110.524 -3.538,110.524 -3.538,-3.476 ; 49.689,26.567 ccw(c51.139,26.567) 51.139,25.117 55.531,25.117 ccw(c55.531,25.371) 55.785,25.371 ccw(c55.531,25.371) 55.531,25.625 51.212,25.625 cw(c51.212,26.64) 50.197,26.64 50.197,31.898 cw(c51.037,31.898) 51.037,32.737 65.864,32.737 ccw(c65.864,33.504) 66.63,33.504 cw(c67.134,33.504) 67.134,34.007 73.488,34.007 ccw(c73.488,34.261) 73.742,34.261 ccw(c73.488,34.261) 73.488,34.515 67.646,34.515 66.966,34.515 ccw(c66.966,33.672) 66.122,33.672 cw(c65.696,33.672) 65.696,33.245 50.942,33.245 ccw(c50.942,31.993) 49.689,31.993 49.689,26.567 ; 49.689,42.11 ccw(c51.139,42.11) 51.139,40.66 55.531,40.66 ccw(c55.531,40.914) 55.785,40.914 ccw(c55.531,40.914) 55.531,41.168 51.212,41.168 cw(c51.212,42.183) 50.197,42.183 50.197,47.441 cw(c51.037,47.441) 51.037,48.28 65.864,48.28 ccw(c65.864,49.047) 66.63,49.047 cw(c67.134,49.047) 67.134,49.55 73.488,49.55 ccw(c73.488,49.804) 73.742,49.804 ccw(c73.488,49.804) 73.488,50.058 67.646,50.058 66.966,50.058 ccw(c66.966,49.215) 66.122,49.215 cw(c65.696,49.215) 65.696,48.788 50.942,48.788 ccw(c50.942,47.536) 49.689,47.536 49.689,42.11 ; 60.865,20.594 ccw(c62.135,20.594) 62.135,19.324 73.565,19.324 ccw(c73.565,19.578) 73.819,19.578 ccw(c73.565,19.578) 73.565,19.832 62.135,19.832 cw(c62.135,20.594) 61.373,20.594 61.373,24.299 ccw(c61.119,24.299) 61.119,24.553 ccw(c61.119,24.299) 60.865,24.299 60.865,20.594
Fabrication:
  drawing of 379 lines, arcs and shapes, not listed
  text "Layer" at 101.575,138.261 h1.52
  text "Name" at 111.986,138.261 h1.52
  text "Material" at 135.602,138.261 h1.52
  text "Thickness" at 149.822,138.261 h1.52
  text "Constant" at 166.328,138.261 h1.52
  text "Board Layer Stack" at 180.803,138.261 h1.52
  text "Top Overlay" at 111.986,135.213 h1.52
  text "Top Solder" at 111.986,132.165 h1.52
  text "SM-001" at 135.602,132.165 h1.52
  text "3.00mil" at 149.822,132.165 h1.52
  text "4" at 166.328,132.165 h1.52
  text "1" at 101.575,129.117 h1.52
  text "Top Layer" at 111.986,129.117 h1.52
  text "10.00mil" at 149.822,129.117 h1.52
  text "Dielectric 1" at 111.986,126.069 h1.52
  text "FR-4" at 135.602,126.069 h1.52
  text "37.00mil" at 149.822,126.069 h1.52
  text "4.8" at 166.328,126.069 h1.52
  text "2" at 101.575,123.021 h1.52
  text "Bottom Layer" at 111.986,123.021 h1.52
  text "10.00mil" at 149.822,123.021 h1.52
  text "Bottom Solder" at 111.986,119.973 h1.52
  text "SM-001" at 135.602,119.973 h1.52
  text "3.00mil" at 149.822,119.973 h1.52
  text "4" at 166.328,119.973 h1.52
  text "Bottom Overlay" at 111.986,116.925 h1.52
  text "Total board thickness:" at 101.575,113.877 h1.52
  text "63.00mil" at 149.822,113.877 h1.52
Drill Drawing:
  drawing of 158 lines, arcs and shapes, not listed
  text "Symbol" at -15.48,207.696 h1.83
  text "Count" at -2.631,207.696 h1.83
  text "Hole Size" at 12.605,207.696 h1.83
  text "Plated" at 41.806,207.696 h1.83
  text "Hole Type" at 54.656,207.696 h1.83
  text "Drill Layer Pair" at 73.294,207.696 h1.83
  text "Via/Pad" at 111.383,207.696 h1.83
  text "Pad Shape" at 126.365,207.696 h1.83
  text "Template" at 145.308,207.696 h1.83
  text "Hole Length" at 174.256,207.696 h1.83
  text "Routed Path Length" at 201.934,207.696 h1.83
  text "1" at -2.631,203.886 h1.52
  text "1.100mm (43.31mil)" at 12.605,203.886 h1.52
  text "NPTH" at 41.806,203.886 h1.52
  text "Round" at 54.656,203.886 h1.52
  text "Top Layer - Bottom Layer" at 73.294,203.886 h1.52
  text "Pad" at 111.383,203.886 h1.52
  text "Rectangle" at 126.365,203.886 h1.52
  text "s0hn110" at 145.308,203.886 h1.52
  text "-" at 174.256,203.886 h1.52
  text "-" at 201.934,203.886 h1.52
  text "1" at -2.631,200.076 h1.52
  text "1.600mm (62.99mil)" at 12.605,200.076 h1.52
  text "NPTH" at 41.806,200.076 h1.52
  text "Round" at 54.656,200.076 h1.52
  text "Top Layer - Bottom Layer" at 73.294,200.076 h1.52
  text "Pad" at 111.383,200.076 h1.52
  text "Rectangle" at 126.365,200.076 h1.52
  text "s0hn160" at 145.308,200.076 h1.52
  text "-" at 174.256,200.076 h1.52
  text "-" at 201.934,200.076 h1.52
  text "1" at -2.631,196.266 h1.52
  text "5.000mm (196.85mil)" at 12.605,196.266 h1.52
  text "NPTH" at 41.806,196.266 h1.52
  text "Round" at 54.656,196.266 h1.52
  text "Top Layer - Bottom Layer" at 73.294,196.266 h1.52
  text "Pad" at 111.383,196.266 h1.52
  text "Rounded" at 126.365,196.266 h1.52
  text "c0hn500" at 145.308,196.266 h1.52
  text "-" at 174.256,196.266 h1.52
  text "-" at 201.934,196.266 h1.52
  text "2" at -2.631,192.456 h1.52
  text "0.600mm (23.62mil)" at 12.605,192.456 h1.52
  text "PTH" at 41.806,192.456 h1.52
  text "Slot" at 54.656,192.456 h1.52
  text "Top Layer - Bottom Layer" at 73.294,192.456 h1.52
  text "Pad" at 111.383,192.456 h1.52
  text "Rounded" at 126.365,192.456 h1.52
  text "r90_170h60_140r100" at 145.308,192.456 h1.52
  text "1.400mm (55.12mil)" at 174.256,192.456 h1.52
  text "0.800mm (31.50mil)" at 201.934,192.456 h1.52
  text "2" at -2.631,188.646 h1.52
  text "0.600mm (23.62mil)" at 12.605,188.646 h1.52
  text "PTH" at 41.806,188.646 h1.52
  text "Slot" at 54.656,188.646 h1.52
  text "Top Layer - Bottom Layer" at 73.294,188.646 h1.52
  text "Pad" at 111.383,188.646 h1.52
  text "Rounded" at 126.365,188.646 h1.52
  text "(Mixed)" at 145.308,188.646 h1.52
  text "1.700mm (66.93mil)" at 174.256,188.646 h1.52
  text "1.100mm (43.31mil)" at 201.934,188.646 h1.52
  text "2" at -2.631,184.836 h1.52
  text "0.620mm (24.41mil)" at 12.605,184.836 h1.52
  text "NPTH" at 41.806,184.836 h1.52
  text "Round" at 54.656,184.836 h1.52
  text "Top Layer - Bottom Layer" at 73.294,184.836 h1.52
  text "Pad" at 111.383,184.836 h1.52
  text "Rounded" at 126.365,184.836 h1.52
  text "c0hn62" at 145.308,184.836 h1.52
  text "-" at 174.256,184.836 h1.52
  text "-" at 201.934,184.836 h1.52
  text "2" at -2.631,181.026 h1.52
  text "1.100mm (43.31mil)" at 12.605,181.026 h1.52
  text "PTH" at 41.806,181.026 h1.52
  text "Round" at 54.656,181.026 h1.52
  text "Top Layer - Bottom Layer" at 73.294,181.026 h1.52
  text "Pad" at 111.383,181.026 h1.52
  text "Rounded" at 126.365,181.026 h1.52
  text "c180h110" at 145.308,181.026 h1.52
  text "-" at 174.256,181.026 h1.52
  text "-" at 201.934,181.026 h1.52
  text "2" at -2.631,177.216 h1.52
  text "1.300mm (51.18mil)" at 12.605,177.216 h1.52
  text "PTH" at 41.806,177.216 h1.52
  text "Round" at 54.656,177.216 h1.52
  text "Top Layer - Bottom Layer" at 73.294,177.216 h1.52
  text "Pad" at 111.383,177.216 h1.52
  text "Rounded" at 126.365,177.216 h1.52
  text "c210h130" at 145.308,177.216 h1.52
  text "-" at 174.256,177.216 h1.52
  text "-" at 201.934,177.216 h1.52
  text "4" at -2.631,173.406 h1.52
  text "3.000mm (118.11mil)" at 12.605,173.406 h1.52
  text "NPTH" at 41.806,173.406 h1.52
  text "Round" at 54.656,173.406 h1.52
  text "Top Layer - Bottom Layer" at 73.294,173.406 h1.52
  text "Pad" at 111.383,173.406 h1.52
  text "Rounded" at 126.365,173.406 h1.52
  text "c0hn300" at 145.308,173.406 h1.52
  text "-" at 174.256,173.406 h1.52
  text "-" at 201.934,173.406 h1.52
  text "6" at -2.631,169.596 h1.52
  text "1.600mm (62.99mil)" at 12.605,169.596 h1.52
  text "PTH" at 41.806,169.596 h1.52
  text "Round" at 54.656,169.596 h1.52
  text "Top Layer - Bottom Layer" at 73.294,169.596 h1.52
  text "Pad" at 111.383,169.596 h1.52
  text "(Mixed)" at 126.365,169.596 h1.52
  text "(Mixed)" at 145.308,169.596 h1.52
  text "-" at 174.256,169.596 h1.52
  text "-" at 201.934,169.596 h1.52
  text "8" at -2.631,165.786 h1.52
  text "3.170mm (124.80mil)" at 12.605,165.786 h1.52
  text "NPTH" at 41.806,165.786 h1.52
  text "Round" at 54.656,165.786 h1.52
  text "Top Layer - Bottom Layer" at 73.294,165.786 h1.52
  text "Pad" at 111.383,165.786 h1.52
  text "Rounded" at 126.365,165.786 h1.52
  text "c0hn317" at 145.308,165.786 h1.52
  text "-" at 174.256,165.786 h1.52
  text "-" at 201.934,165.786 h1.52
  text "34" at -2.631,161.976 h1.52
  text "1.020mm (40.16mil)" at 12.605,161.976 h1.52
  text "PTH" at 41.806,161.976 h1.52
  text "Round" at 54.656,161.976 h1.52
  text "Top Layer - Bottom Layer" at 73.294,161.976 h1.52
  text "Pad" at 111.383,161.976 h1.52
  text "(Mixed)" at 126.365,161.976 h1.52
  text "(Mixed)" at 145.308,161.976 h1.52
  text "-" at 174.256,161.976 h1.52
  text "-" at 201.934,161.976 h1.52
  text "300" at -2.631,158.166 h1.52
  text "0.300mm (11.81mil)" at 12.605,158.166 h1.52
  text "PTH" at 41.806,158.166 h1.52
  text "Round" at 54.656,158.166 h1.52
  text "Top Layer - Bottom Layer" at 73.294,158.166 h1.52
  text "Via" at 111.383,158.166 h1.52
  text "Rounded" at 126.365,158.166 h1.52
  text "v60h30" at 145.308,158.166 h1.52
  text "-" at 174.256,158.166 h1.52
  text "-" at 201.934,158.166 h1.52
  text "365 Total" at -2.631,154.356 h1.52
  text "Slot definitions :" at -15.48,150.673 h1.52
  text "Routed Path Length" at 10.75,150.673 h1.52
  text "= Calculated from tool start centre position to tool end centre position." at 38.758,150.673 h1.52
  text "Hole Length" at 10.75,148.134 h1.52
  text "= Routed Path Length + Tool Size = Slot length as defined in the PCB layout" at 28.347,148.134 h1.52

## Dimensions
57.988,104.524 to 76.462,90.693 on Dimensions
57.988,104.524 to 51.988,110.524 on Dimensions
76.462,90.693 to 57.988,104.524 on Dimensions
51.988,110.524 to 76.462,90.693 on Dimensions
-3.538,110.524 to -3.538,-3.476 on Dimensions
-3.538,110.524 to 76.462,90.693 on Dimensions

## Text inside footprints (layer, text, board x,y; h text height)
J1: Top Overlay "Board Edge" at -2.227,97.332 h0.71 r270
J3: Top Overlay "PCB Edge" at 8.045,-2.608 h1
J4: Top Overlay "PCB Edge" at 41.357,-2.608 h1
J6: Top Overlay "PCB Edge" at 24.701,-2.608 h1
J7: Top Overlay "PCB Edge" at 58.014,-2.608 h1
J9: Top Overlay "18" at 29.345,30.699 h0.5 r270; Top Overlay "1" at 29.32,38.954 h0.5 r270; Top Overlay "PCB Edge" at 26.917,35.847 h0.5 r270
J12: Top Overlay "1" at 47.563,55.198 h0.8; Top Overlay "2" at 47.969,60.481 h0.8; Top Overlay "52" at 71.008,60.515 h0.8; Top Overlay "51" at 70.601,55.156 h0.8
K1: Top Overlay "1" at 64.663,25.433 h0.8 r180
K2: Top Overlay "1" at 64.663,41.041 h0.8 r180
SW1: Top Overlay "PCB Edge" at -3.238,85.906 h1 r270